# Altium PCB PCB1.PcbDoc (part 5 of 5)
Units mm, origin at the board's own origin, x right, y up, seen from the top; angles counter-clockwise.
Board outline 130 x 90 mm, 4 copper layers (Top Layer, Int 1 (GND), Int 2 (PWR), Bottom Layer), stack 1.466 mm thick; 419 components, 281 nets, 1355 pads, 522 vias.
Unrouted connection lines stored in the file: 26.
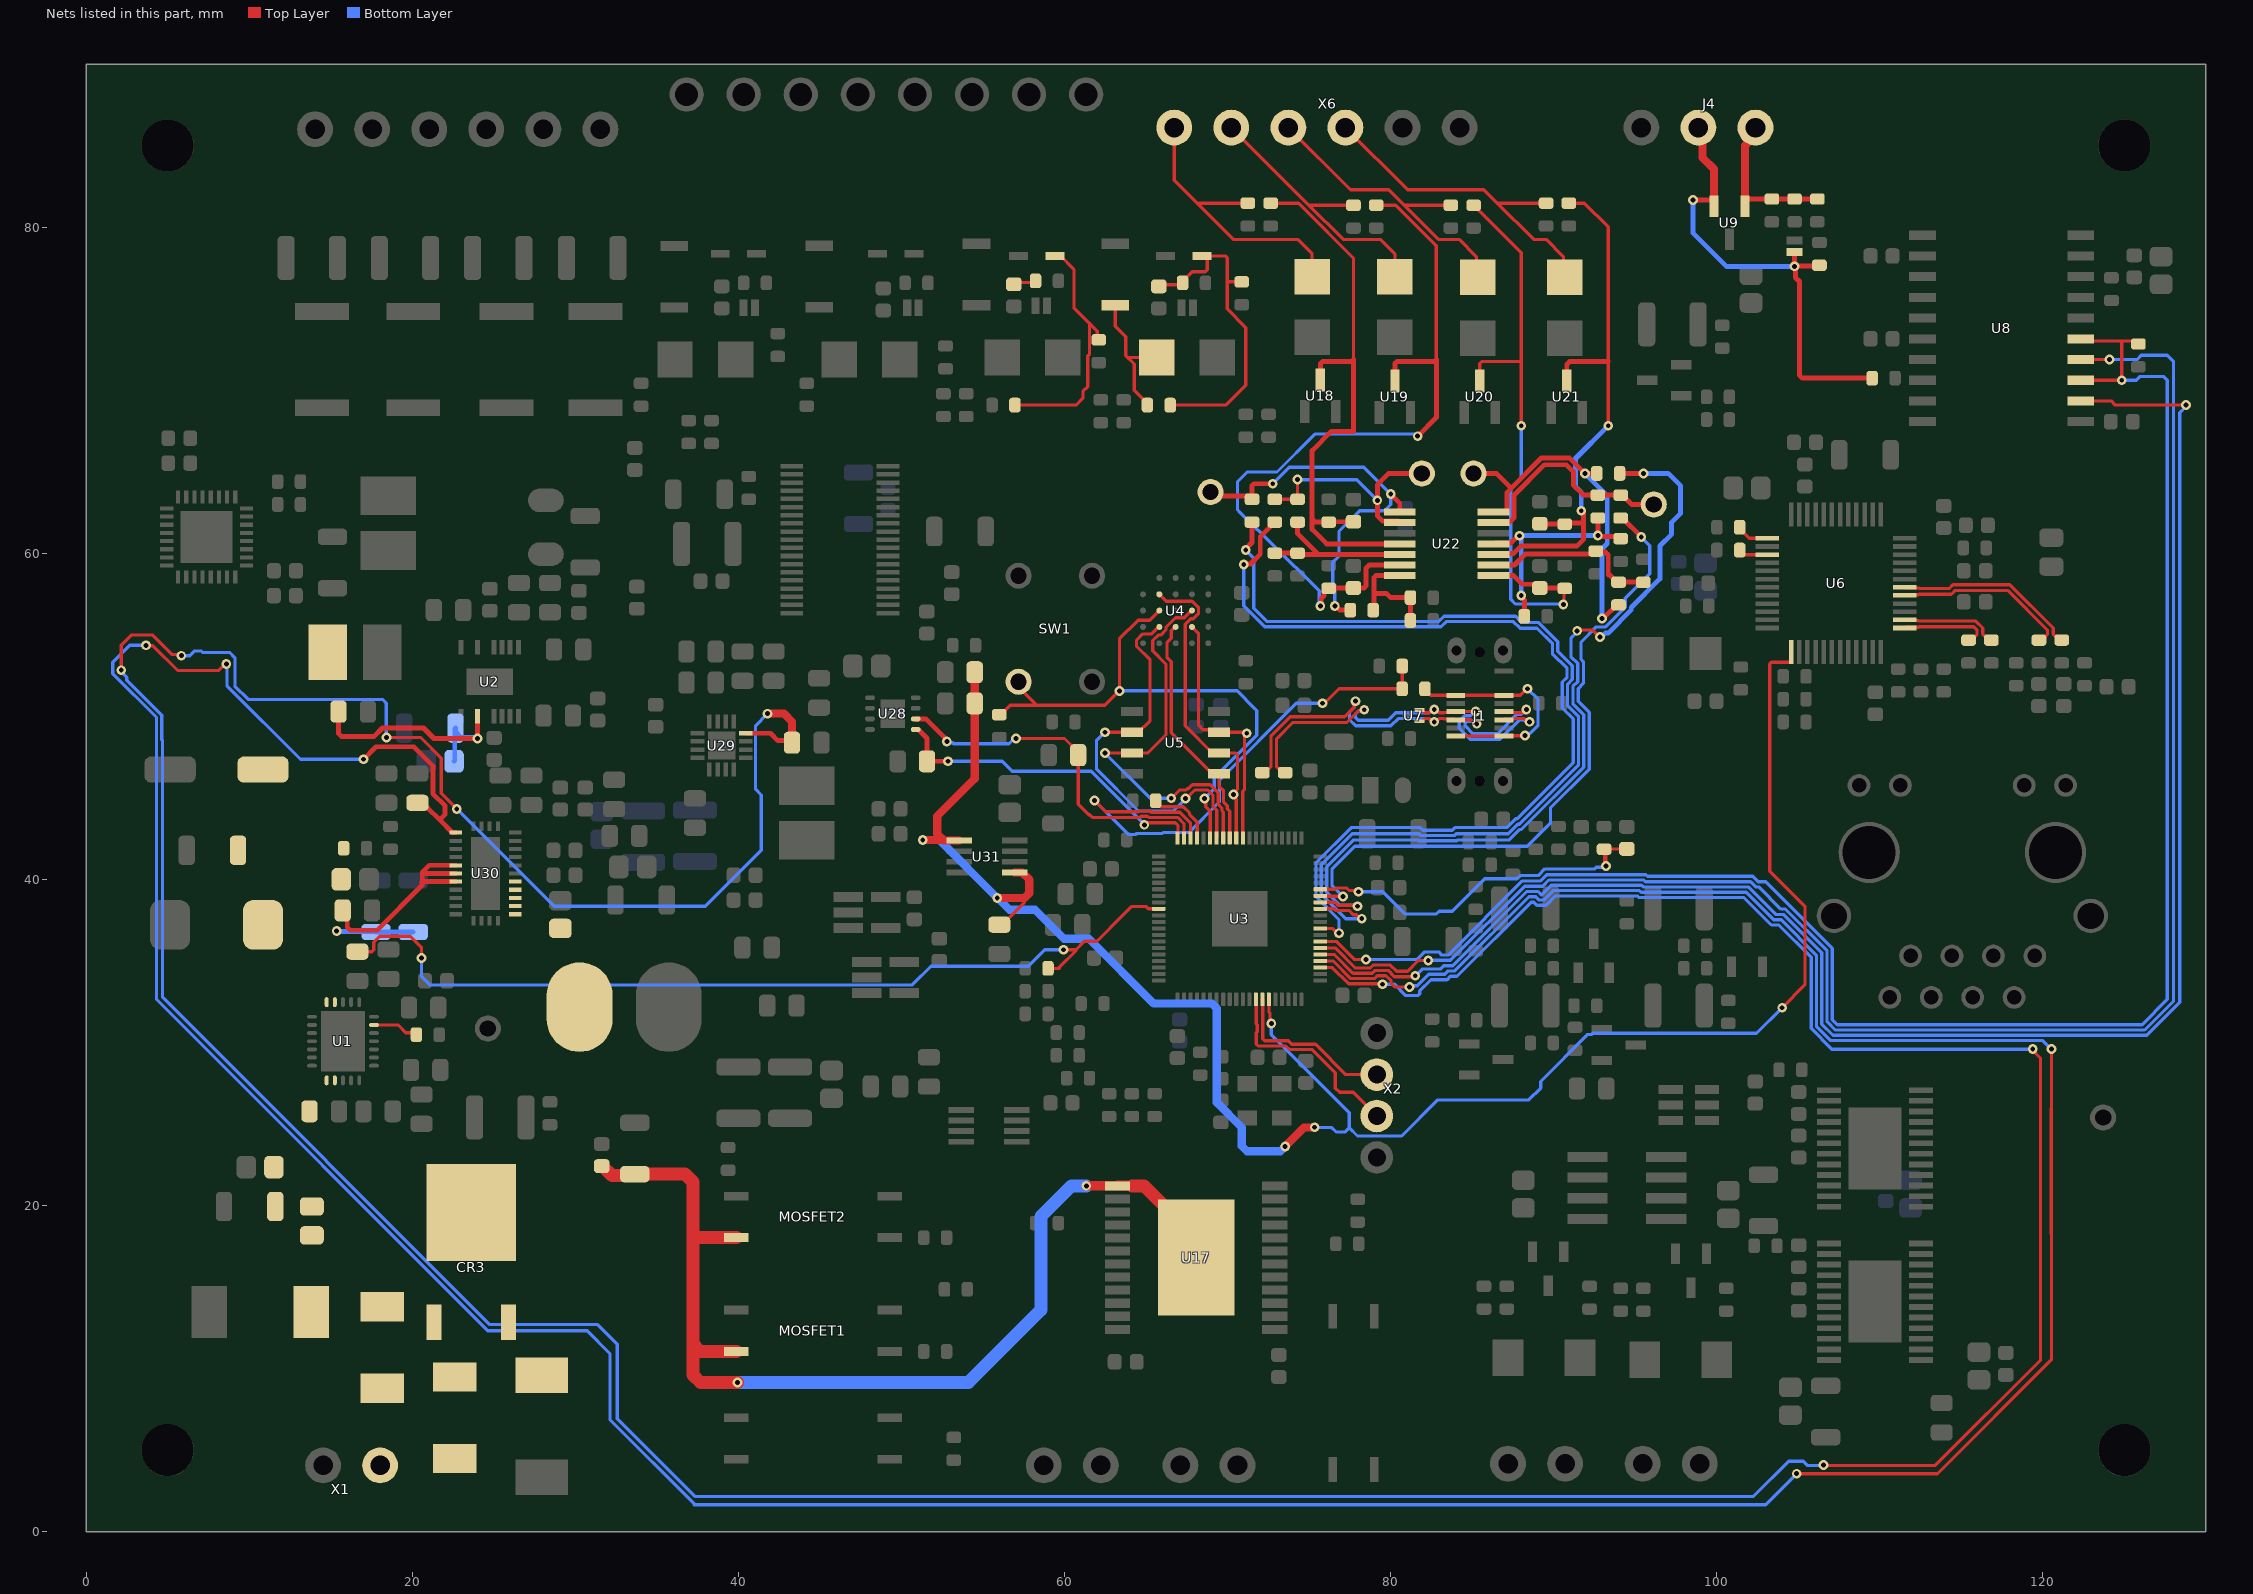
[diagram p7: the nets of this part, all layers, seen from the top]

## Via types
v1: diameter 0.6, hole 0.3, Top Layer to Bottom Layer, tented both sides, 508 vias
v2: diameter 0.6, hole 0.3, Top Layer to Bottom Layer, 14 vias

## Nets (pads, with @x,y where several pads share a name; then routed paths per layer and width w, separated by ;. In a path a pad name is that pad's centre, name@x,y a point inside that pad or via, vN(x,y) a via of type N, cw(c..) or ccw(c..) an arc to the next point about the centre after c; other vN are vias at no path point) (continued)
NODE_AI2_PROT: C74.2 CR10.1 R65.2 R70.1 R77.1 | length 17.1
  Top Layer w0.2: C74.2@56.896,76.494 57.003,76.601 58.121,76.601 R70.1@58.228,76.708 ; R65.2@56.961,69.088 60.706,69.088 61.13,69.512 61.13,69.924 61.428,70.222 61.428,72.104 61.539,72.215 61.539,74.097 61.468,74.168 ; CR10.1@59.411,78.232 59.756,78.232 60.579,77.409 60.579,75.057 61.468,74.168 ; R77.1@62.103,73.09 62.013,73.18 62.013,73.623 61.468,74.168
NODE_AI3_CLAMP: CR7.1 F6.1 R66.1 | length 8.9
  Top Layer w0.2: F6.1@63.119,75.203 63.119,73.914 63.754,73.279 63.754,72.126 ; R66.1@65.086,69.088 65.086,69.188 64.272,70.002 64.272,71.608 63.754,72.126 ; CR7.1@65.659,72.009 63.871,72.009 63.754,72.126
NODE_AI3_PROT: C75.2 CR11.1 R66.2 R71.1 R79.1 | length 20.3
  Top Layer w0.2: C75.2@65.786,76.367 65.893,76.474 67.138,76.474 R71.1@67.245,76.581 67.245,76.681 67.827,77.263 68.637,77.263 68.754,77.38 68.754,78.099 CR11.1@68.621,78.232 ; R66.2@66.486,69.088 69.898,69.088 71.12,70.31 71.12,73.844 69.977,74.987 69.977,76.646 ; CR11.1@68.428,78.232 CR11.1@68.621,78.232 ; R79.1@70.866,76.646 69.977,76.646 ; CR11.1@68.621,78.232 69.86,78.232 69.977,78.115 69.977,76.646
PHY_GREEN: R53.1 U6.25 | length 2
  Top Layer w0.2: R53.1@101.411,61.595 101.411,61.495 101.99,60.916 U6.25@103.099,60.916
PHY_RX_N: R39.1 U6.5 | length 10.8
  Top Layer w0.2: U6.5@111.531,57.416 111.571,57.456 112.366,57.456 112.401,57.491 114.399,57.491 114.631,57.723 117.835,57.723 120.284,55.273 120.284,55.042 120.167,54.925 120.152,54.925 119.902,54.675 R39.1@119.761,54.675
PHY_RX_P: R40.1 U6.6 | length 11.4
  Top Layer w0.2: U6.6@111.531,57.916 111.571,57.876 112.366,57.876 112.401,57.841 114.254,57.841 114.486,58.073 117.98,58.073 120.635,55.418 120.635,55.042 120.752,54.925 120.767,54.925 121.017,54.675 R40.1@121.158,54.675
PHY_TX_N: R48.1 U6.1 | length 5.5
  Top Layer w0.2: U6.1@111.531,55.416 111.571,55.456 112.366,55.456 112.401,55.491 115.749,55.491 115.966,55.273 115.966,55.042 115.849,54.925 115.834,54.925 115.584,54.675 R48.1@115.443,54.675
PHY_TX_P: R41.1 U6.2 | length 6
  Top Layer w0.2: U6.2@111.531,55.916 111.571,55.876 112.366,55.876 112.401,55.841 115.894,55.841 116.317,55.418 116.317,55.042 116.434,54.925 116.449,54.925 116.699,54.675 R41.1@116.84,54.675
PHY_YELLOW: R52.1 U6.27 | length 1.8
  Top Layer w0.2: R52.1@101.411,60.198 101.411,60.16 101.655,59.916 U6.27@103.099,59.916
PSRAM_CS_N: R30.1 U3.77 | length 4.1
  Top Layer w0.2: R30.1@65.597,44.831 65.597,44.772 65.919,44.45 67.296,44.45 67.674,44.072 67.674,43.979 68.075,43.578 68.075,43.558 68.136,43.497 U3.77@68.136,42.545
PWR_3V3_PGOOD_N: R160.2 U3.43 U29.4 | length 296.2
  Top Layer w0.2: v1(2.159,52.832) 2.159,54.356 2.794,54.991 4.064,54.991 5.257,53.798 5.765,53.798 v1(5.842,53.721) ; v1(18.415,48.708) 20.507,48.708 21.78,47.434 21.78,45.276 v1(22.733,44.323) ; U3.43@75.686,34.595 76.421,34.595 77.423,33.593 79.478,33.593 v1(79.502,33.569) ; v1(106.553,4.081) 106.57,4.064 113.411,4.064 119.855,10.508 119.855,29.039 119.38,29.514 v1(119.38,29.591)
  Top Layer w0.3: U29.4@40.452,48.961 41.971,48.961 42.418,48.514 R160.2@43.296,48.514
  Top Layer w0.5: v1(41.783,50.165) 42.799,50.165 43.296,49.668 43.296,48.514 R160.2@43.296,48.387
  Bottom Layer w0.2: v1(2.159,52.832) 2.159,52.724 2.496,52.387 2.496,52.212 4.643,50.065 4.643,48.567 4.688,48.522 4.688,32.777 24.765,12.7 31.369,12.7 32.578,11.491 32.578,6.919 37.338,2.159 102.255,2.159 104.414,4.318 105.302,4.318 105.556,4.064 106.536,4.064 v1(106.553,4.081) ; v1(5.842,53.721) 6.359,53.721 6.641,54.003 7.075,54.003 7.162,53.916 8.815,53.916 9.127,53.604 9.127,51.853 9.943,51.037 18.178,51.037 18.415,50.8 v1(18.415,48.708) ; v1(22.733,44.323) 28.702,38.354 37.973,38.354 41.401,41.782 41.401,45.176 41.054,45.523 41.054,49.436 v1(41.783,50.165) ; v1(79.502,33.569) 80.243,33.569 80.936,32.876 81.666,32.876 81.783,32.993 81.783,33.159 82.477,33.853 83.462,33.853 83.669,34.06 84.073,34.06 88.614,38.601 88.78,38.601 88.971,38.41 89.535,38.41 90.114,38.989 95.123,38.989 95.223,38.889 101.67,38.889 103.355,37.203 103.815,37.203 105.791,35.227 105.791,30.861 107.061,29.591 v1(119.38,29.591)
PWR_5V_PGOOD_N: R164.2 U3.44 U30.16 | length 262.6
  Top Layer w0.2: v1(3.683,54.356) 3.717,54.322 4.098,54.322 5.605,52.815 8.141,52.815 8.528,53.202 v1(8.602,53.202) ; U3.44@75.686,34.995 76.481,34.995 77.558,33.918 79.014,33.918 79.19,34.094 79.719,34.094 80.027,33.786 80.027,33.638 80.264,33.401 v1(81.153,33.401) ; v1(104.902,3.556) 113.538,3.556 120.523,10.541 120.514,25.907 cw(c121.539,25.908) 120.523,26.044 v1(120.523,29.591)
  Top Layer w0.3: v1(17.018,47.371) 17.78,48.133 20.106,48.133 21.27,46.969 21.27,45.256 22.018,44.508 22.018,43.989 21.684,43.655 ; R164.2@20.32,44.693 20.608,44.405 20.934,44.405 21.684,43.655 ; U30.16@22.674,42.865 22.474,42.865 21.684,43.655
  Bottom Layer w0.2: v1(3.683,54.356) 2.667,54.356 1.634,53.323 1.634,52.615 4.318,49.931 4.318,32.639 24.638,12.319 30.734,12.319 32.131,10.922 32.131,6.858 37.284,1.705 37.284,1.651 102.997,1.651 v1(104.902,3.556) ; v1(8.602,53.202) 8.636,53.168 8.636,51.884 13.149,47.371 v1(17.018,47.371) ; v1(81.153,33.401) 81.23,33.478 81.642,33.478 82.342,34.178 83.327,34.178 83.534,34.385 83.939,34.385 88.487,38.933 88.908,38.933 89.106,38.735 89.4,38.735 89.979,39.314 95.258,39.314 95.358,39.214 101.804,39.214 103.49,37.528 103.95,37.528 106.116,35.362 106.116,30.996 106.996,30.116 119.998,30.116 v1(120.523,29.591)
PWR_IN_FAULT_N: R2.1 R15.1 U3.9 | length 56.4
  Top Layer w0.2: R2.1@16.637,35.571 17.525,35.571 17.642,35.688 17.642,36.145 18.01,36.513 19.875,36.513 20.574,35.814 v1(20.574,35.179) ; R15.1@58.993,34.544 59.003,34.534 59.69,34.534 59.69,34.613 60.706,35.629 60.706,35.687 ; v1(59.944,35.687) 60.706,35.687 ; 63.611,37.82 61.995,36.204 61.281,36.204 61.272,36.195 61.214,36.195 60.706,35.687 ; 63.612,37.82 64.137,38.345 64.84,38.345 64.996,38.345 65.146,38.195 U3.9@65.786,38.195
  Bottom Layer w0.2: v1(20.574,35.179) 20.574,34.036 21.082,33.528 50.673,33.528 51.816,34.671 57.783,34.671 58.799,35.687 v1(59.944,35.687)
PWR_IN_IMON: R1.2 U1.18 | length 2.8
  Top Layer w0.2: U1.18@17.653,31.075 19.13,31.075 19.605,30.6 20.135,30.6 R1.2@20.255,30.48
QSPI_SCLK: U3.71 U4.B2 U5.6 | length 19.6
  Top Layer w0.2: U4.B2@65.818,57.483 66.249,57.052 67.826,57.052 68.226,56.652 68.226,56.314 67.895,55.983 67.741,55.983 67.41,55.652 67.41,49.417 69.075,47.752 U5.6@69.474,47.752 70.495,47.752 70.612,47.635 70.612,45.529 70.358,45.275 v1(70.358,45.212) 70.358,45.104 70.536,44.926 U3.71@70.536,42.545
QSPI_SD0: U3.72 U4.D3 U5.5 | length 15
  Top Layer w0.2: U4.D3@66.818,55.483 66.773,55.483 66.551,55.261 66.551,54.793 66.294,54.536 66.294,53.597 66.551,53.34 66.551,49.006 69.075,46.482 U5.5@69.474,46.482 69.474,45.726 69.755,45.445 69.755,44.742 69.986,44.511 69.986,44.334 70.136,44.184 U3.72@70.136,42.545
QSPI_SD1: U3.74 U4.D2 U5.2 | length 24.1
  Top Layer w0.2: v1(62.484,49.022) U5.2@64.13,49.022 64.529,49.022 65.247,49.74 65.247,53.477 64.41,54.314 64.41,54.652 64.81,55.052 65.35,55.052 65.782,55.483 U4.D2@65.818,55.483 ; v1(67.43,44.958) 67.457,44.958 67.982,45.483 68.797,45.483 69.105,45.175 69.105,44.473 69.336,44.242 U3.74@69.336,42.545
  Bottom Layer w0.2: v1(62.484,49.022) 61.959,48.497 61.959,46.778 64.541,44.196 66.668,44.196 v1(67.43,44.958)
QSPI_SD2: U3.73 U4.C4 U5.3 | length 25.1
  Top Layer w0.2: v1(62.484,47.752) U5.3@64.13,47.752 65.108,47.752 66.226,48.87 66.226,53.205 65.41,54.021 65.41,54.652 65.741,54.983 65.895,54.983 66.226,55.314 66.226,55.468 66.81,56.052 67.35,56.052 67.782,56.483 U4.C4@67.818,56.483 ; v1(66.548,44.975) 66.565,44.975 67.073,45.483 67.454,45.483 67.525,45.554 67.593,45.554 67.847,45.808 68.932,45.808 69.43,45.31 69.43,44.607 69.661,44.376 69.661,44.199 69.736,44.124 U3.73@69.736,42.545
  Bottom Layer w0.2: v1(62.484,47.752) 65.261,44.975 v1(66.548,44.975)
QSPI_SD3: U3.70 U4.D4 U5.7 | length 15.8
  Top Layer w0.2: U4.D4@67.818,55.483 68.226,55.075 68.226,49.455 68.496,49.185 69.311,49.185 U5.7@69.474,49.022 v1@71.043,49.022 ; U3.70@70.936,42.545 70.936,45.394 71.036,45.494 71.036,48.705 71.043,48.712 71.043,48.945 71.082,48.984 71.12,49.022 v1(71.178,48.964)
QSPI_SS: R28.2 SW1.1 U3.75 U4.C2 | length 34.4
  Top Layer w0.2: R28.2@56.007,50.103 56.107,50.103 56.677,50.673 58.283,50.673 ; SW1.1@57.186,52.122 57.186,51.78 58.166,50.8 58.166,50.79 58.283,50.673 ; U4.C2@65.818,56.483 65.226,55.891 64.516,55.891 63.373,54.748 v1(63.373,51.562) 62.484,50.673 58.283,50.673 ; v1(68.58,44.958) 68.657,44.881 68.657,44.461 68.936,44.182 U3.75@68.936,42.545
  Bottom Layer w0.2: v1(63.373,51.562) 70.592,51.562 71.645,50.509 71.798,50.357 71.798,48.841 69.183,46.226 69.183,45.561 v1(68.58,44.958)
RS485_A_ISO: J4.1 R57.2 R58.2 R60.2 U9.1 | length 9.2
  Top Layer w0.3: U9.1@101.727,81.661 101.792,81.726 R57.2@103.378,81.726 R60.2@104.775,81.726 R58.2@106.172,81.726
  Top Layer w0.5: U9.1@101.727,81.661 101.727,84.996 102.377,85.646 J4.1@102.377,86.106
RS485_B_ISO: J3.2 J4.2 R56.2 R59.2 U9.2 | length 32.8
  Top Layer w0.3: J3.2@104.775,78.486 v1(104.775,77.597) ; R59.2@106.299,77.659 106.268,77.628 104.806,77.628 v1(104.775,77.597) ; R56.2@109.536,70.739 105.249,70.739 105.073,70.915 105.073,76.664 104.832,76.905 104.832,77.54 v1(104.775,77.597) ; v1(98.552,81.661) U9.2@99.827,81.661 ; v1(98.552,81.661) U9.2@99.827,81.661 ; v1(98.552,81.661) U9.2@99.827,81.661 ; v1(98.552,81.661) U9.2@99.827,81.661
  Top Layer w0.5: J4.2@98.877,86.106 99.132,85.851 99.132,84.256 99.827,83.561 U9.2@99.827,81.661
  Bottom Layer w0.3: v1(98.552,81.661) 98.552,79.629 100.584,77.597 v1(104.775,77.597)
RS485_DE_RE: R54.1 U3.47 U8.3 U8.5 | length 111.3
  Top Layer w0.2: U3.47@75.686,36.195 76.66,36.195 77.762,35.093 v1(78.486,35.093) ; U8.3@122.326,70.612 v1(124.841,70.612) 124.841,72.908 124.724,73.025 ; U8.5@122.326,73.152 122.453,73.025 124.724,73.025 ; R54.1@125.857,72.836 125.668,73.025 124.724,73.025
  Bottom Layer w0.2: v1(78.486,35.093) 81.63,35.093 82.09,35.553 82.946,35.553 83.138,35.36 83.535,35.36 88.083,39.908 89.195,39.908 89.576,40.289 95.661,40.289 95.761,40.189 102.208,40.189 102.533,39.864 103.011,39.864 106.999,35.876 106.999,35.858 107.091,35.766 107.091,31.399 107.399,31.091 126.087,31.091 127.635,32.639 127.635,70.612 127.41,70.837 125.948,70.837 125.723,70.612 v1(124.841,70.612)
RS485_RX: U3.46 U8.4 | length 107.7
  Top Layer w0.2: U3.46@75.686,35.795 76.6,35.795 77.827,34.568 78.744,34.568 78.92,34.744 79.989,34.744 80.372,34.361 81.04,34.361 81.707,35.028 v1@82.307,35.028 ; U8.4@122.326,71.882 v1(124.079,71.882)
  Bottom Layer w0.2: v1(82.307,35.028) 82.314,35.035 83.67,35.035 88.217,39.583 89.329,39.583 89.71,39.964 95.527,39.964 95.627,39.864 102.074,39.864 102.399,39.539 102.574,39.539 103.935,38.178 104.219,38.178 106.766,35.631 106.766,33.251 106.766,31.265 107.265,30.766 126.24,30.766 128.016,32.542 128.016,71.755 127.635,72.136 126.038,72.136 125.784,71.882 v1(124.079,71.882)
RS485_TX: U3.45 U8.2 | length 106.4
  Top Layer w0.2: U3.45@75.686,35.395 76.54,35.395 77.692,34.243 78.879,34.243 79.055,34.419 79.854,34.419 80.237,34.036 81.458,34.036 v1(81.513,34.091) ; U8.2@122.326,69.342 124.079,69.342 124.187,69.342 124.441,69.088 v1(128.778,69.088)
  Bottom Layer w0.2: v1(81.513,34.091) 81.536,34.091 81.949,34.503 83.045,34.503 83.252,34.71 83.804,34.71 88.352,39.258 89.042,39.258 89.24,39.06 89.266,39.06 89.845,39.639 95.392,39.639 95.492,39.539 101.939,39.539 103.625,37.853 104.084,37.853 106.441,35.497 106.441,33.386 106.441,31.13 107.13,30.441 126.374,30.441 128.397,32.464 128.397,68.62 128.778,69.001 v1(128.778,69.088)
SW_NODE: C113.2 L5.1 U30.1 U30.2 U30.3 U30.4 U30.5
SWD_CLK: U3.33 X2.3 | length 12.6
  Top Layer w0.2: U3.33@71.736,32.645 71.761,32.62 71.761,31.15 71.815,31.096 71.815,30.661 71.761,30.607 71.761,29.9 71.878,29.783 73.586,29.783 73.807,29.562 75.204,29.562 76.61,28.156 76.61,27.2 76.87,26.94 77.702,26.94 X2.3@79.153,25.489
SWD_IO: U3.34 X2.2 | length 10.3
  Top Layer w0.2: U3.34@72.136,32.645 72.161,32.62 72.161,30.225 72.278,30.108 73.72,30.108 73.942,29.887 75.396,29.887 77.254,28.029 X2.2@79.153,28.029
SYS_RESET_N: R168.2 R169.2 R170.2 U3.35 U6.37 U31.1 U31.5 | length 123.8
  Top Layer w0.2: R170.2@56.007,37.222 56.182,37.222 57.537,38.577 57.537,38.848 57.604,38.916 ; U3.35@72.536,32.645 72.536,31.867 72.611,31.792 72.611,31.242 v1(72.686,31.167) ; v1(104.013,32.131) 105.41,33.528 105.41,38.354 103.251,40.513 103.251,53.213 103.357,53.319 104.525,53.319 104.565,53.358 U6.37@104.565,53.95
  Top Layer w0.5: v1(51.308,42.418) 52.578,42.418 52.619,42.377 ; U31.1@53.55,42.377 52.619,42.377 ; R169.2@54.494,52.705 R168.2@54.494,50.8 54.494,46.173 52.197,43.876 52.197,42.799 52.619,42.377 ; v1(55.88,38.862) 57.551,38.862 57.604,38.916 57.843,39.155 57.843,39.983 57.399,40.427 U31.5@56.94,40.427 ; v1(73.533,23.622) 74.69,24.779 75.325,24.779 v1(75.344,24.798)
  Bottom Layer w0.2: v1(72.686,31.167) 72.686,30.484 77.47,25.7 77.47,24.765 ; v1@75.363,24.779 76.39,24.779 76.653,24.516 77.221,24.516 77.47,24.765 ; v1(104.013,32.131) 102.44,30.558 92.407,30.558 92.34,30.491 92.086,30.491 89.202,27.607 89.202,27.201 88.48,26.479 82.887,26.479 80.672,24.264 77.971,24.264 77.47,24.765
  Bottom Layer w0.5: v1(51.308,42.418) 52.324,42.418 v1(55.88,38.862) 55.907,38.862 56.629,38.14 58.192,38.14 59.97,36.362 61.495,36.362 65.472,32.385 69.049,32.385 69.342,32.092 69.342,26.314 70.871,24.785 70.871,23.661 71.204,23.328 73.24,23.328 v1(73.533,23.622) ; v1(75.344,24.798) v1@75.363,24.779
UIC0_COMP_N: R133.2 R137.2 TP4.1 U22.2 | length 14.5
  Top Layer w0.2: R137.2@72.898,63.311 R133.2@74.295,63.311 v1(74.295,64.516) ; U22.2@80.453,61.989 U22.2@80.564,61.879
  Top Layer w0.3: U22.2@80.453,61.989 79.49,61.989 79.188,62.292 v1(79.188,63.246) 79.188,64.202 79.883,64.897 TP4.1@81.915,64.897
  Bottom Layer w0.2: v1(74.295,64.516) 77.918,64.516 v1(79.188,63.246)
UIC0_FIELD: CR16.1 R120.2 X6.6 | length 18
  Top Layer w0.2: X6.6@66.731,86.106 66.731,82.875 68.199,81.407 ; R120.2@71.247,81.472 68.264,81.472 68.199,81.407 ; CR16.1@75.184,76.962 75.184,78.359 74.295,79.248 70.358,79.248 68.199,81.407
UIC0_IN: R137.1 U3.49 | length 59
  Top Layer w0.2: v1(70.993,59.309) v1@71.027,59.343 ; R137.1@72.594,61.607 72.594,61.667 72.839,61.911 R137.1@72.898,61.911 ; U3.49@75.686,36.995 76.435,36.995 76.727,36.703 v1(76.835,36.703)
  Top Layer w0.3: v1@71.027,59.343 71.408,59.343 72.009,59.944 72.009,61.022 R137.1@72.594,61.607
  Bottom Layer w0.2: v1(70.993,59.309) 70.993,56.778 72.278,55.493 83.091,55.493 83.411,55.813 87.531,55.813 87.916,55.428 87.942,55.403 88.977,55.403 89.933,54.446 89.933,54.012 89.926,54.004 89.926,53.838 90.822,52.942 90.822,52.396 90.531,52.105 90.531,50.511 91.203,49.839 91.203,47.157 87.759,43.713 87.664,43.713 87.131,43.18 83.947,43.18 83.781,43.014 81.991,43.014 81.825,43.18 77.574,43.18 75.43,41.035 75.43,38.942 76.835,37.537 v1(76.835,36.703)
UIC0_SENSE: C99.1 R112.1 R116.1 U18.3 U22.4 | length 36.5
  Top Layer w0.2: R116.1@72.644,81.472 74.357,81.472 74.676,81.153 77.724,78.105 77.724,71.882 77.597,71.755 ; 77.607,67.473 77.724,67.473
  Top Layer w0.3: U18.3@75.692,70.612 75.692,71.628 75.819,71.755 77.597,71.755 ; R112.1@76.2,61.911 75.376,61.911 75.184,62.103 ; R112.1@76.225,61.936 C99.1@77.724,61.936 ; 77.607,67.473 76.363,67.473 75.184,66.294 75.184,62.103 ; 77.724,67.473 77.724,71.882 ; U22.4@80.564,60.579 76.073,60.579 75.184,61.468 75.184,62.103
UIC0_THRESH: R126.2 R129.1 R133.1 U22.5 | length 10.2
  Top Layer w0.2: R126.2@74.295,60.009 R126.2@74.375,59.929
  Top Layer w0.3: R129.1@72.898,60.009 R126.2@74.295,60.009 ; R133.1@74.295,61.911 74.295,61.204 75.57,59.929 ; R126.2@74.375,59.929 75.57,59.929 ; U22.5@80.564,59.929 75.57,59.929
UIC1_COMP_N: R132.2 R136.2 TP3.1 U22.1 | length 24.9
  Top Layer w0.2: TP3.1@68.961,63.754 TP3.1@69.2,63.515 ; R136.2@71.297,63.515 R136.2@71.501,63.311
  Top Layer w0.3: TP3.1@69.2,63.515 R136.2@71.297,63.515 ; R136.2@71.501,63.311 71.501,64.145 71.618,64.262 v1(72.771,64.262) ; v1(76.581,56.768) 76.642,56.768 76.895,56.515 R132.2@77.532,56.515 ; v1(80.01,63.627) 80.564,63.073 U22.1@80.564,62.529
  Bottom Layer w0.2: v1(72.771,64.262) 73.787,65.278 78.359,65.278 v1(80.01,63.627) 80.01,62.992 79.629,62.611 78.105,62.611 76.835,61.341 76.835,59.817 76.454,59.436 76.454,58.182 76.581,58.055 v1(76.581,56.768)
UIC1_FIELD: CR17.1 R121.2 X6.5 | length 17.4
  Top Layer w0.2: X6.5@70.231,86.106 74.993,81.343 ; R121.2@77.724,81.345 74.995,81.345 74.993,81.343 ; CR17.1@80.264,76.962 80.264,78.359 79.375,79.248 77.089,79.248 74.993,81.343
UIC1_IN: R136.1 U3.52 | length 59.8
  Top Layer w0.2: U3.52@75.686,38.195 76.537,38.195 76.637,38.095 77.449,38.095 77.715,37.829 77.887,37.829 78.124,37.592 v1(78.232,37.592)
  Top Layer w0.3: v1(71.12,60.198) 71.12,60.279 71.501,60.66 R136.1@71.501,61.911
  Bottom Layer w0.2: v1(71.12,60.198) 71.613,59.705 71.613,56.618 72.413,55.818 82.956,55.818 83.276,56.138 87.666,56.138 88.051,55.753 89.086,55.753 90.258,54.581 90.258,53.995 91.147,53.106 91.147,52.262 90.856,51.971 90.856,50.645 91.528,49.973 91.528,47.022 87.894,43.388 87.798,43.388 87.209,42.799 84.026,42.799 83.915,42.689 81.857,42.689 81.747,42.799 77.653,42.799 75.755,40.901 75.755,39.077 77.24,37.592 v1(78.232,37.592)
UIC1_SENSE: C100.1 R113.1 R117.1 U19.3 U22.6 | length 49.6
  Top Layer w0.2: R113.1@76.2,57.847 R113.1@76.213,57.86 ; C100.1@77.712,57.86 C100.1@77.724,57.872 ; R117.1@79.121,81.345 80.326,81.345 82.804,78.867 82.804,71.882 82.677,71.755
  Top Layer w0.3: v1(75.692,56.768) 75.749,56.825 75.749,57.227 75.915,57.393 75.915,57.649 76.114,57.847 R113.1@76.2,57.847 ; R113.1@76.213,57.86 C100.1@77.712,57.86 ; C100.1@77.724,57.872 78.369,57.872 78.486,57.989 78.486,59.065 78.7,59.279 U22.6@80.564,59.279 ; U19.3@80.264,70.561 80.264,71.638 80.381,71.755 82.677,71.755 ; v1(81.661,67.183) 82.804,68.326 82.804,71.882
  Bottom Layer w0.2: v1(75.692,56.768) 75.627,56.833 75.627,57.688 75.282,58.033 70.729,62.556 70.612,62.673 70.612,62.756 70.612,64.389 71.208,64.985 73.034,64.985 75.359,67.31 81.544,67.31 81.661,67.193 v1(81.661,67.183)
UIC1_THRESH: R124.2 R127.1 R132.1 U22.7 | length 7.4
  Top Layer w0.2: R132.1@78.932,56.515 R132.1@78.994,56.577 ; 78.994,58.512 79.111,58.629
  Top Layer w0.3: R132.1@78.994,56.577 78.994,57.544 ; 78.994,58.512 78.994,57.544 ; 79.111,58.629 U22.7@80.564,58.629 ; R127.1@81.215,55.88 R124.2@81.215,57.277 80.01,57.277 79.743,57.544 78.994,57.544
UIC2_COMP_N: R134.2 R138.2 TP5.1 U22.14 | length 22.4
  Top Layer w0.3: TP5.1@85.09,64.897 86.487,64.897 87.393,63.991 ; U22.14@86.314,62.529 87.082,62.529 87.142,62.589 87.142,63.74 87.393,63.991 ; R138.2@92.645,64.897 v1(91.914,64.897) 90.96,65.851 89.253,65.851 87.393,63.991 ; v1(92.964,56.007) 93.042,56.007 93.866,56.831 R134.2@93.98,56.831
  Bottom Layer w0.3: v1(91.914,64.897) 93.285,63.526 93.285,60.603 92.964,60.282 v1(92.964,56.007)
UIC2_FIELD: CR18.1 R122.2 X6.4 | length 19.1
  Top Layer w0.2: X6.4@73.731,86.106 77.541,82.296 79.883,82.296 80.772,81.407 ; R122.2@83.693,81.345 80.834,81.345 80.772,81.407 ; CR18.1@85.344,76.914 85.265,76.993 85.265,78.184 84.201,79.248 82.931,79.248 80.772,81.407
UIC2_IN: R138.1 U3.53 | length 50.8
  Top Layer w0.2: U3.53@75.686,38.595 76.597,38.595 76.772,38.42 77.278,38.42 77.912,38.42 v1(77.978,38.354) ; v1(91.44,55.245) 91.486,55.291 92.41,55.291 v1(92.837,54.864)
  Top Layer w0.3: R138.1@94.045,64.897 v1(95.504,64.897)
  Bottom Layer w0.2: v1(77.978,38.354) 77.912,38.42 76.872,38.42 76.85,38.441 76.08,39.212 76.08,40.766 77.732,42.418 81.668,42.418 81.722,42.364 84.05,42.364 84.104,42.418 87.288,42.418 87.933,43.063 88.028,43.063 91.853,46.888 91.853,50.108 91.181,50.78 91.181,51.836 91.472,52.127 91.472,53.249 91.059,53.662 91.059,54.777 91.44,55.158 v1(91.44,55.245)
  Bottom Layer w0.3: v1(92.837,54.864) 92.918,54.864 93.161,55.107 93.337,55.107 94.757,56.528 94.757,56.677 96.513,58.432 96.513,60.445 97.238,61.17 97.238,61.898 97.79,62.45 97.79,64.135 97.028,64.897 v1(95.504,64.897)
UIC2_SENSE: C101.1 R114.1 R118.1 U20.3 U22.8 | length 38.4
  Top Layer w0.2: R118.1@85.09,81.345 85.149,81.345 85.394,81.101 85.394,81.041 88.011,78.424 88.011,71.755 ; U20.3@85.471,70.561 85.471,71.638 85.588,71.755 88.011,71.755 ; v1(88.011,67.818) 88.011,71.755 ; v1(90.594,56.853) 90.636,56.894 90.636,57.805 R114.1@90.678,57.847 R114.1@90.666,57.86
  Top Layer w0.3: U22.8@86.314,58.629 87.548,58.629 88.079,58.098 88.928,58.098 C101.1@89.154,57.872 89.167,57.86 R114.1@90.666,57.86
  Bottom Layer w0.2: v1(88.011,67.818) 88.011,64.601 87.373,63.964 87.373,57.172 87.657,56.888 90.559,56.888 v1(90.594,56.853)
UIC2_THRESH: R125.2 R130.1 R134.1 U22.9 | length 11.1
  Top Layer w0.3: U22.9@86.314,59.279 87.6,59.279 88.265,59.944 92.107,59.944 92.115,59.951 92.398,59.951 R125.2@92.583,60.136 92.648,60.071 93.169,60.071 93.345,59.895 93.345,58.674 93.423,58.674 93.866,58.231 R134.1@93.98,58.231 93.982,58.229 95.502,58.229 R130.1@95.504,58.228
UIC3_COMP_N: R135.2 R139.2 TP6.1 U22.13 | length 13.6
  Top Layer w0.3: U22.13@86.314,61.879 86.375,61.939 87.327,61.939 87.567,62.179 87.567,63.564 89.429,65.426 90.784,65.426 91.207,65.003 91.207,64.184 91.81,63.581 92.694,63.581 R135.2@92.71,63.565 R139.2@94.107,63.565 94.221,63.565 94.794,62.992 TP6.1@96.139,62.992
UIC3_FIELD: CR19.1 R123.2 X6.3 | length 20.9
  Top Layer w0.2: X6.3@77.231,86.106 81.041,82.296 85.725,82.296 86.55,81.471 ; R123.2@89.535,81.472 86.552,81.472 86.55,81.471 ; CR19.1@90.678,76.914 90.599,76.993 90.599,78.184 89.535,79.248 88.773,79.248 86.55,81.471
UIC3_IN: R139.1 U3.54 | length 41
  Top Layer w0.2: U3.54@75.686,38.995 75.711,38.97 77.064,38.97 v1(77.089,38.945)
  Top Layer w0.3: R139.1@94.107,62.165 94.207,62.165 v1(95.369,61.003)
  Bottom Layer w0.2: v1(77.089,38.945) 76.405,39.629 76.405,40.632 77.81,42.037 88.392,42.037 89.804,43.449 89.804,44.379 92.162,46.737 92.178,46.761 92.178,50.242 92.119,50.301 91.506,50.915 91.506,51.701 91.827,52.022 91.827,53.354 91.677,53.504 91.677,54.542 92.617,55.482 93.181,55.482 94.382,56.683 94.382,57.247 95.885,58.75 95.885,60.459 v1@95.369,60.975
  Bottom Layer w0.3: v1@95.369,60.975 v1(95.369,61.003)
UIC3_SENSE: C102.1 R115.1 R119.1 U21.3 U22.10 | length 35.4
  Top Layer w0.2: R119.1@90.932,81.472 91.886,81.472 93.345,80.013 93.345,71.755 v1(93.345,67.818)
  Top Layer w0.3: U22.10@86.314,59.929 86.375,59.989 87.548,59.989 88.011,60.452 91.44,60.452 91.821,60.833 91.821,61.849 ; C102.1@89.154,61.809 89.167,61.797 90.666,61.797 R115.1@90.678,61.784 90.743,61.849 91.821,61.849 ; U21.3@90.805,70.561 90.805,71.579 90.981,71.755 93.345,71.755 ; v1(91.694,62.611) 91.821,62.484 91.821,61.849
  Bottom Layer w0.3: v1(91.694,62.611) 91.694,63.736 91.339,64.091 91.339,65.812 v1(93.345,67.818)
UIC3_THRESH: R128.2 R131.1 R135.1 U22.11 | length 14.2
  Top Layer w0.3: U22.11@86.314,60.579 86.375,60.639 87.384,60.639 87.817,61.073 v1(87.898,61.073) ; v1(88.011,57.413) 88.011,57.332 88.2,57.143 R128.2@88.2,56.134 ; R135.1@92.71,62.165 v1(92.71,61.087) 92.767,61.03 93.975,61.03 R131.1@94.107,60.898
  Bottom Layer w0.3: v1(88.011,57.413) 88.011,60.879 87.898,60.992 v1(87.898,61.073) 87.913,61.087 v1(92.71,61.087)
USB_DM: J1.A7 J1.B7 R18.2 U7.2 | length 26.7
  Top Layer w0.2: R18.2@73.533,46.547 73.392,46.547 73.142,46.797 73.127,46.797 73.01,46.914 73.01,48.626 74.007,49.623 77.325,49.623 78.032,50.33 78.31,50.33 v1(78.387,50.407) ; U7.2@81.778,50.388 81.968,50.388 81.978,50.378 81.978,50.33 82.095,50.213 82.378,50.213 82.578,50.413 v1(82.677,50.413) 82.785,50.413 82.985,50.213 83.263,50.213 83.285,50.236 J1.A7@83.934,50.236 ; J1.A7@83.986,50.288 83.988,50.29 85.215,50.29 v1(85.217,50.292) ; J1.B7@86.956,49.788 87.008,49.84 87.657,49.84 87.679,49.863 88.211,49.863 88.411,49.663 v1(88.519,49.663)
  Bottom Layer w0.2: v1(78.387,50.407) 78.31,50.33 78.04,50.33 77.827,50.118 77.827,49.952 78.013,49.766 79.865,49.766 80.312,50.213 82.369,50.213 82.569,50.413 v1(82.677,50.413) ; v1(85.217,50.292) 85.149,50.292 84.9,50.043 84.539,50.043 84.216,49.72 84.216,49.265 84.889,48.592 86.706,48.592 87.886,49.773 88.202,49.773 88.235,49.74 88.442,49.74 v1(88.519,49.663)
USB_DP: J1.A6 J1.B6 R19.2 U7.1 | length 26.6
  Top Layer w0.2: R19.2@72.136,46.547 72.277,46.547 72.527,46.797 72.542,46.797 72.659,46.914 72.659,48.783 73.849,49.973 77.18,49.973 77.774,50.568 77.774,50.855 v1(77.849,50.929) ; U7.1@81.778,49.688 81.968,49.688 81.978,49.698 81.978,49.746 82.095,49.863 82.378,49.863 82.578,49.663 v1(82.677,49.663) 82.785,49.663 82.985,49.863 83.263,49.863 83.285,49.84 J1.A6@83.934,49.84 ; J1.A6@83.986,49.788 84.929,49.788 85.175,49.542 v1(85.283,49.542) ; J1.B6@86.956,50.288 87.008,50.236 87.657,50.236 87.679,50.213 88.207,50.213 88.325,50.33 v1(88.325,50.413)
  Bottom Layer w0.2: v1(77.849,50.929) 77.772,50.853 77.772,50.558 77.477,50.263 77.477,49.807 77.868,49.416 80.01,49.416 80.457,49.863 82.369,49.863 82.569,49.663 v1(82.677,49.663) ; v1(85.283,49.542) 85.175,49.542 85.025,49.693 84.683,49.693 84.566,49.575 84.566,49.41 85.034,48.942 86.561,48.942 87.741,50.123 88.007,50.123 88.297,50.413 v1(88.325,50.413)
USB_VBUS: J1.A4 J1.A9 J1.B4 J1.B9 R42.2 | length 14.5
  Top Layer w0.2: R42.2@82.107,51.689 82.107,51.63 82.449,51.288 J1.A9@83.986,51.288 87.944,51.288 88.346,51.689 v1(88.392,51.689) ; J1.A4@83.986,48.788 J1.B9@86.956,48.788 86.973,48.805 88.225,48.805 v1(88.242,48.822)
  Bottom Layer w0.2: v1(88.242,48.822) 88.351,48.822 88.485,48.957 88.556,48.957 88.736,49.138 89.044,49.446 89.044,51.037 v1(88.392,51.689)
USB_VBUS_DET: R42.1 R43.2 U3.78 | length 33
  Top Layer w0.2: v1(61.849,44.831) 62.524,44.156 64.538,44.156 64.578,44.196 65.216,44.196 65.256,44.156 65.289,44.156 65.32,44.125 67.068,44.125 67.349,43.844 67.661,43.532 67.736,43.457 U3.78@67.736,42.545 ; v1(75.819,50.8) 75.946,50.8 76.835,51.689 R42.1@80.707,51.689 80.709,51.691 80.709,53.084 R43.2@80.71,53.086
  Bottom Layer w0.2: v1(61.849,44.831) 63.93,42.75 64.359,42.75 64.43,42.821 65.998,42.821 66.047,42.87 67.615,42.87 69.508,44.763 69.508,46.092 74.216,50.8 v1(75.819,50.8)
VFIELD: CR2.1 CR3.1 CR3.3 F2.1
VFIELD_OUT: C94.2 C97.2 CR3.2 MOSFET1.6 MOSFET2.6 U17.1 U17.25 | length 69.6
  Top Layer w0.6: v1(61.341,21.209) U17.1@63.225,21.209 ; U17.1@63.225,21.209 U17.1@63.246,21.23 ; U17.1@63.225,21.209 U17.1@63.246,21.23 ; U17.1@63.225,21.209 U17.1@63.246,21.23 ; U17.1@63.225,21.209 U17.1@63.246,21.23 ; U17.1@63.246,21.23 64.507,21.23 ; U17.1@63.246,21.23 64.507,21.23 ; U17.1@63.246,21.23 64.507,21.23 ; U17.1@63.246,21.23 64.507,21.23
  Top Layer w0.8: C97.2@31.623,22.419 31.673,22.419 32.258,21.834 33.569,21.834 C94.2@33.655,21.92 36.742,21.92 37.211,21.451 37.211,18.034 ; MOSFET1.6@39.878,11.049 37.68,11.049 37.211,11.518 ; MOSFET2.6@39.878,18.034 37.211,18.034 ; v1(39.941,9.144) 37.68,9.144 37.211,9.613 37.211,11.518 ; 64.135,21.209 64.878,21.209 68.072,18.015 U17.25@68.072,16.808 ; 37.211,11.518 37.211,18.034
  Bottom Layer w0.8: v1(39.941,9.144) 54.102,9.144 58.559,13.601 58.559,19.338 60.43,21.209 v1(61.341,21.209)
VIN_FILTERED: C4.1 C5.1 FB1.2 R7.1 U1.8 U1.9
VIN_FUSED: CR1.1 F1.1 FB1.1 | length 0.3
  Top Layer w1: F1.1@18.161,13.548 F1.1@18.161,13.802
VIN_PROTECTED: C1.1 C2.1 C6.2 C8.2 C107.2 C109.2 C111.2 D1.2 L1.2 R10.1 R21.2 R166.1 U1.23 U1.24 U2.3 U30.20 U30.21 U30.22 | length 33.8
  Top Layer w0.3: R10.1@15.483,50.292 15.483,48.944 15.659,48.768 17.662,48.768 18.177,49.283 20.694,49.283 21.336,48.641 v2(24.003,48.641) U2.3@24.003,50.013 ; R166.1@15.726,37.846 16.014,37.558 16.014,37.061 16.19,36.885 17.852,36.885 20.599,39.632 20.599,39.848 20.616,39.865 20.616,40.428 21.053,40.865 U30.20@22.674,40.865 ; 20.691,39.865 U30.22@22.674,39.865 ; 20.829,40.365 U30.21@22.674,40.365
  Bottom Layer w0.3: v2(15.367,36.83) 15.393,36.804 17.754,36.804 C107.2@17.78,36.779 C109.2@20.066,36.779 ; C8.2@22.567,47.244 22.612,47.289 C6.2@22.612,49.231 ; C6.2@22.657,49.276 22.657,49.041 22.999,48.698 23.946,48.698 v2(24.003,48.641)
VIN_PROTECTED_MON: C30.2 R_RP1.1 U3.55 | length 21.9
  Top Layer w0.2: U3.55@75.686,39.395 76.611,39.395 76.686,39.47 77.087,39.47 77.306,39.47 77.457,39.32 77.956,39.32 v1(78.033,39.243) ; R_RP1.1@93.091,41.845 93.104,41.858 94.476,41.858 C30.2@94.488,41.87
  Top Layer w0.3: R_RP1.1@93.091,41.845 93.161,41.775 93.161,40.871 v1(93.218,40.814)
  Bottom Layer w0.2: v1(78.033,39.243) 79.524,39.243 80.882,37.885 82.814,37.885 82.975,38.046 83.791,38.046 85.78,40.035 87.75,40.035 87.948,40.233 89.06,40.233 89.467,40.64 92.518,40.64 92.618,40.74 93.144,40.74 v1(93.218,40.814)
VIN_RAW: F1.2 F2.2 X1.2 | length 0
  Top Layer w1: X1.2@18.133,3.81 X1.2@18.147,3.824
WD_ENABLE: R159.1 U3.80 U28.5 | length 20.2
  Top Layer w0.2: v1(64.897,43.346) 65.005,43.346 65.134,43.475 66.799,43.475 66.961,43.313 66.961,42.85 U3.80@66.936,42.545
  Top Layer w0.3: U28.5@50.874,49.193 51.024,49.193 51.573,48.644 R159.1@51.573,47.244 v1(52.849,47.244)
  Bottom Layer w0.2: v1(52.849,47.244) 56.188,47.244 56.794,46.638 61.639,46.638 64.897,43.38 v1(64.897,43.346)
WD_KICK: R167.1 U3.79 U28.6 | length 22.2
  Top Layer w0.2: v1(57.023,48.641) 60.003,48.641 60.727,47.917 60.727,47.742 R167.1@60.844,47.625 60.844,44.62 61.493,43.971 61.546,43.971 61.717,43.8 64.608,43.8 64.639,43.831 64.672,43.831 64.712,43.871 65.082,43.871 65.122,43.831 65.155,43.831 65.186,43.8 66.933,43.8 67.336,43.397 U3.79@67.336,42.545
  Top Layer w0.3: U28.6@50.874,49.843 51.503,49.843 52.728,48.618 52.728,48.507 v1(52.785,48.45)
  Bottom Layer w0.2: v1(52.785,48.45) 52.861,48.373 53.144,48.373 53.192,48.326 56.6,48.326 56.915,48.641 v1(57.023,48.641)
pads on no net: J1.17 J1.18 J1.19 J1.20 J1.21 J1.A8 J1.B8 J1.S_1_H1 J2.7 J2.13 J2.15 J4. J5. J10. J11. SW1.2 SW1.4 U1.1 U1.2 U1.3 U1.4 U1.5 U1.6 U1.7 U1.11 U1.16 U1.21 U2.6 U3.26 U3.27 U3.28 U3.42 U3.48 U3.58 U4.A2 U4.A3 U4.A5 U4.B1 U4.B5 U4.C1 U4.C3 U4.C5 U4.D1 U4.D5 U4.E1 U4.E2 U4.E3 U4.E4 U4.E5 U6.7 U6.12 U6.13 U6.18 U6.24 U6.26 U6.38 U6.39 U6.40 U6.41 U6.42 U6.46 U6.47 U8.7 U10.35 U12.18 U12.20 U13.18 U13.20 U16.17 U16.19 U16.21 U16.23 U16.30 U18.2 U19.2 U20.2 U21.2 U28.2 U30.7 U30.19 U30.23 U30.27 U30.28 U30.29 U30.30 U32.4 U33.4 X1. X2. X3. X3.6 X4. X5. X6.

## Polygon pours and split planes (outlines as drawn)
AO0_RET on Top Layer "AO0_RET_L01_P041" (solid, pour order 41): 100.711,2.413 100.965,2.667 100.965,14.097 99.06,14.097 98.933,13.97 98.933,8.255 97.402,7.493 97.402,2.413
AO1_OUT on Top Layer "AO1_OUT_L01_P040" (solid, pour order 40): 88.646,2.413 85.217,2.413 85.217,14.351 88.138,14.351 88.138,8.001 88.646,7.493
AO1_RET on Top Layer "AO1_RET_L01_P039" (solid, pour order 39): 88.9,2.413 92.71,2.413 92.71,14.097 90.805,14.097 90.805,9.525 88.9,7.62
AO0_OUT on Top Layer "AO0_OUT_L01_P038" (solid, pour order 38): 97.155,2.54 97.028,2.413 93.599,2.413 93.599,14.224 93.726,14.097 96.52,14.097 96.52,7.874 97.155,7.239
VIN_FILTERED on Top Layer "VIN_FILTERED_L01_P000" (solid, pour order 0): 14.478,27.168 14.107,26.797 13.735,26.797 13.726,26.807 12.573,25.654 10.795,23.653 10.795,19.05 17.018,19.05 17.018,21.59 14.859,23.749 14.859,26.416 15.503,27.06 15.503,28.093 14.914,28.093 14.621,28.093 14.478,27.95
EFUSE_RTN on Top Layer "EFUSE_RTN_TOP" (solid, pour order 21): 18.034,27.559 21.082,27.559 20.955,27.686 20.955,29.083 22.733,29.083 22.733,27.16 21.717,26.289 19.304,26.289 19.177,26.416 12.192,26.416 12.192,33.782 18.034,33.782
GND_SYS on Top Layer "GND_SYS_L01_P028" (solid, pour order 28): 13.97,63.373 15.113,64.516 15.113,64.897 13.97,64.897 12.319,64.897 12.319,62.103 11.43,62.103 10.414,63.119 10.414,63.881 9.656,63.881 9.654,63.879 8.891,63.882 8.89,63.881 8.89,62.611 7.874,62.611 7.874,64.897 6.985,64.897 6.985,62.611 5.582,62.611 5.588,59.309 9.271,59.309 9.271,58.801 10.795,58.801 10.795,59.69 12.065,59.69 12.192,59.563 12.192,56.642 13.97,56.642
NetC12_2 on Top Layer "NETC12_2_L01_P037" (solid, pour order 37): 14.097,59.436 16.129,59.436 16.129,61.849 29.337,61.849 29.337,64.516 28.956,64.897 15.875,64.897 14.097,63.119
GND_SYS on Top Layer "GND_SYS_L01_P015" (solid, pour order 15): 47.117,49.53 45.847,48.26 47.619,46.488 47.619,46.228 50.546,46.228 50.546,48.514 50.292,48.514 50.292,53.975 47.879,53.975 47.879,51.562 48.641,51.562 48.641,49.53
NetC12_1 on Top Layer "NETC12_1_L01_P035" (solid, pour order 35): 16.637,58.42 17.78,57.277 21.717,57.277 22.352,56.642 22.352,56.007 22.86,55.499 23.241,55.118 24.257,54.737 24.257,53.721 20.193,53.721 19.431,52.197 16.764,52.197 16.764,56.261 14.859,56.261 14.097,57.023 14.097,58.42
GND_SYS on Top Layer "GND_SYS_L01_P025" (solid, pour order 25): 16.637,58.674 17.78,57.531 24.003,57.531 24.384,57.15 29.21,57.15 29.21,58.928 24.638,58.928 21.971,61.595 16.637,61.595
+15V_AO on Top Layer "+15V_AO_L01_P034" (solid, pour order 34): 30.48,60.706 31.623,59.563 31.623,58.674 32.385,57.912 32.385,53.34 29.591,53.34 29.591,55.118 30.734,55.118 31.115,55.499 31.115,57.277 29.845,57.277 29.464,57.658 29.464,59.055 27.051,59.055 27.051,61.468 29.337,61.468 30.099,60.706
GND_SYS on Top Layer "GND_SYS_L01_P024" (solid, pour order 24): 20.32,50.673 22.352,50.673 32.004,50.673 32.004,52.705 31.623,53.086 20.32,53.086
+5V_PRE on Top Layer "+5V_PRE_L01_P009" (solid, pour order 9): 41.275,33.274 41.402,33.147 42.672,33.147 42.648,31.968 47.117,28.956 47.117,27.432 44.958,27.432 44.45,26.924 34.671,26.924 32.908,28.687 32.908,34.246 33.528,34.866 33.528,42.037 32.893,42.037 32.893,43.307 33.528,43.307 33.555,44.069 33.528,44.096 33.528,46.99 29.845,46.99 29.845,45.085 28.448,45.085 28.448,45.466 26.543,45.466 26.543,48.26 35.433,48.26 35.814,48.641 37.973,48.641 37.973,47.117 36.449,47.117 36.449,44.069 38.227,44.069 38.227,42.037 40.513,42.037 40.513,37.084 41.275,37.084
GND_SYS on Top Layer "GND_SYS_L01_P033" (solid, pour order 33): 30.099,37.338 32.571,34.866 33.324,34.866 33.324,37.084 33.401,37.084 33.401,41.91 31.369,41.91 30.861,42.418 29.464,42.418 29.464,39.878 30.099,39.497
GND_SYS on Top Layer "GND_SYS_L01_P023" (solid, pour order 23): 25.574,42.799 25.608,42.765 26.289,42.765 26.289,36.703 25.273,35.687 21.082,35.687 21.082,39.116 23.241,39.116 23.241,48.006 26.289,48.006 26.289,45.339 25.654,45.339 25.574,45.259
SW_NODE on Top Layer "SW_NODE_L01_P007" (solid, pour order 7): 27.701,28.458 32.908,28.458 32.908,34.246 26.939,40.132 26.304,40.132 26.304,33.601 26.939,32.649 26.939,29.22
VIN_PROTECTED on Top Layer "VIN_PROTECTED_L01_P006" (solid, pour order 6): 11.43,51.054 12.7,52.324 12.7,54.737 14.097,56.134 16.51,56.134 16.51,51.181 16.51,37.465 15.484,35.56 15.484,32.122 15.579,32.027 15.546,31.994 9.017,31.994 9.017,34.798 7.628,34.798 7.734,51.054
VFIELD on Top Layer "VFIELD_L01_P031" (solid, pour order 31): 20.447,8.509 31.623,8.509 31.623,14.351 31.242,14.732 20.447,14.732
VFIELD_OUT on Top Layer "VFIELD_OUT_L01_P032" (solid, pour order 32): 20.447,22.733 20.447,15.875 32.004,15.875 35.814,19.685 35.814,22.86 20.447,22.86
VIN_RAW on Top Layer "VIN_RAW_L01_P029" (solid, pour order 29): 20.574,3.429 24.384,3.429 24.384,5.715 24.13,5.715 19.558,5.715 19.558,9.779 16.637,9.779 16.637,1.905 19.05,1.905
GND_SYS on Top Layer "GND_SYS_L01_P011" (solid, pour order 11): 30.607,28.473 30.607,23.114 40.45,23.114 46.27,25.442 46.99,26.162 46.736,26.416 46.736,27.432 44.958,27.432 44.45,26.924 34.671,26.924 33.729,28.519
VIN_FUSED on Top Layer "VIN_FUSED_L01_P030" (solid, pour order 30): 12.954,14.428 14.682,12.7 19.812,12.7 19.812,18.796 12.954,18.796
GND_SYS on Top Layer "GND_SYS_L01_P002" (solid, pour order 2): 7.62,51.308 1.524,51.308 1.524,48.514 1.524,28.702 4.064,26.162 4.064,9.779 11.938,1.905 16.383,1.905 16.383,8.544 10.541,14.386 10.541,25.654 9.017,27.178 9.017,34.798 7.62,34.798
GND_SYS on Top Layer "GND_SYS_L01_P027" (solid, pour order 27): 41.021,54.483 39.624,54.483 39.624,55.753 33.147,55.753 33.147,51.308 34.29,50.165 35.433,50.165 35.433,54.864 37.719,54.864 37.719,51.054 38.989,51.054 38.989,49.149 38.1,49.149 38.1,47.371 38.989,47.371 38.989,46.101 39.243,45.847 39.243,43.815 40.132,42.926 41.275,42.926 41.275,46.228 41.021,46.482 39.878,46.482 39.878,49.149 39.37,49.149 39.37,53.086 41.021,53.086
GND_SYS on Top Layer "GND_SYS_L01_P018" (solid, pour order 18): 5.461,65.151 3.81,65.151 3.81,68.58 5.461,68.58
+3V3_DIG on Top Layer "+3V3_DIG_L01_P016" (solid, pour order 16): 5.969,65.151 7.239,65.151 7.239,68.58 5.969,68.58
DO1_OUT on Top Layer "DO1_OUT_L01_P014" (solid, pour order 14): 71.882,18.288 74.549,18.288 74.549,10.888 68.834,7.967 68.834,2.54 65.024,2.54 65.024,6.858 69.342,11.176 71.882,11.176
DO2_OUT on Top Layer "DO2_OUT_L01_P013" (solid, pour order 13): 57.277,2.54 60.833,2.54 60.833,7.747 64.135,11.049 64.135,18.415 61.595,18.415 59.436,12.7 57.277,7.747
EFUSE_RTN on Bottom Layer "EFUSE_RTN_BOTTOM" (solid, pour order 19): 11.89,33.909 19.558,33.909 19.558,26.162 11.735,26.162
+3V3_DIG on Int 1 (GND) "+3V3_DIG_L02_P003" (solid, pour order 3): 0,0 130,0 130,90 0,90
+3V3_DIG on Int 2 (PWR) "+3V3_DIG_L03_P004" (solid, pour order 4): 0,0 130,0 130,90 0,90

## Keep-outs
Keep-Out Layer:
  circle w2: c5,5 r3
  rectangle: 121,1 129,9
  rectangle: 121,81 129,89
  rectangle: 1,81 9,89

## Other copper
Int 1 (GND):
  pour cut-out: 13.589,32.766 13.589,27.305 13.716,27.432 18.034,27.432 18.034,32.766
  pour cut-out: 13.589,32.766 18.034,32.766 18.034,27.432 13.462,27.432 13.589,27.559

## Silkscreen, mask and mechanical layers (free items; w line width, h text height)
Mechanical 1:
  lines w0.254: 0.039,0 129.96,0 129.96,90 0.039,90 0.039,0
Mechanical 15:
  the board outline again, w1.2

## Text inside footprints (layer, text, board x,y; h text height)
CR3: Mechanical 13 "*" at 21.018,14.808 h1.27; Top Overlay "*" at 18.098,12.205 h1.27
CR8: Mechanical 13 "*" at 41.021,78.994 h1.27 r180; Top Overlay "*" at 42.4,78.994 h1.27 r180
CR9: Mechanical 13 "*" at 50.673,78.994 h1.27 r180; Top Overlay "*" at 52.052,78.994 h1.27 r180
CR10: Mechanical 13 "*" at 59.309,78.867 h1.27 r180; Top Overlay "*" at 60.688,78.867 h1.27 r180
CR11: Mechanical 13 "*" at 68.326,78.867 h1.27 r180; Top Overlay "*" at 69.705,78.867 h1.27 r180
F3: Top Overlay "*" at 35.293,74.257 h1.27 r90
F4: Top Overlay "*" at 44.183,74.276 h1.27 r90
F5: Top Overlay "*" at 53.835,74.384 h1.27 r90
F6: Top Overlay "*" at 62.344,74.384 h1.27 r90
MOSFET1: Top Overlay "*" at 52.07,10.287 h1.27 r180
MOSFET2: Top Overlay "*" at 51.943,17.399 h1.27 r180
MOSFET4: Top Overlay "*" at 52.07,3.937 h1.27 r180
U5: Top Overlay "*" at 63.559,50.723 h1.27
U6: Mechanical 13 "*" at 110.757,55.801 h1.27 r180; Top Overlay "*" at 113.215,55.42 h1.27 r180
U8: Mechanical 13 "*" at 121.209,68.669 h1.27 r180; Top Overlay "*" at 122.898,67.641 h1.27 r180
U10: Mechanical 13 "*" at 44.044,64.389 h1.27; Top Overlay "*" at 42.707,65.485 h1.27
U12: Mechanical 13 "*" at 111.887,20.896 h1.27 r180; Top Overlay "*" at 113.093,19.696 h1.27 r180
U13: Mechanical 13 "*" at 111.887,11.498 h1.27 r180; Top Overlay "*" at 113.093,10.298 h1.27 r180
U14: Mechanical 13 "*" at 96.609,27.544 h1.27; Top Overlay "*" at 96.609,27.544 h1.27
U15: Mechanical 13 "*" at 53.105,26.096 h1.27; Top Overlay "*" at 53.105,26.096 h1.27
U16: Mechanical 13 "*" at 5.032,62.361 h1.27; Top Overlay "*" at 3.589,62.361 h1.27
U17: Top Overlay "*" at 62.674,21.64 h1.27
U28: Top Overlay "Designator25" at 47.899,52.632 h1.27
U29: Mechanical 13 "*" at 40.091,47.846 h1.27 r180; Top Overlay "*" at 41.83,47.465 h1.27 r180
U31: Mechanical 13 "*" at 52.978,42.606 h1.27; Top Overlay "*" at 52.978,42.606 h1.27